# Altium PCB ESP32_C3_TempHumidity_Monitor.PcbDoc
Units mm, origin at the board's own origin, x right, y up, seen from the top; angles counter-clockwise.
Board outline 65.79 x 56.14 mm, 2 copper layers (Top Layer, Bottom Layer); 69 components, 38 nets, 240 pads, 341 vias.
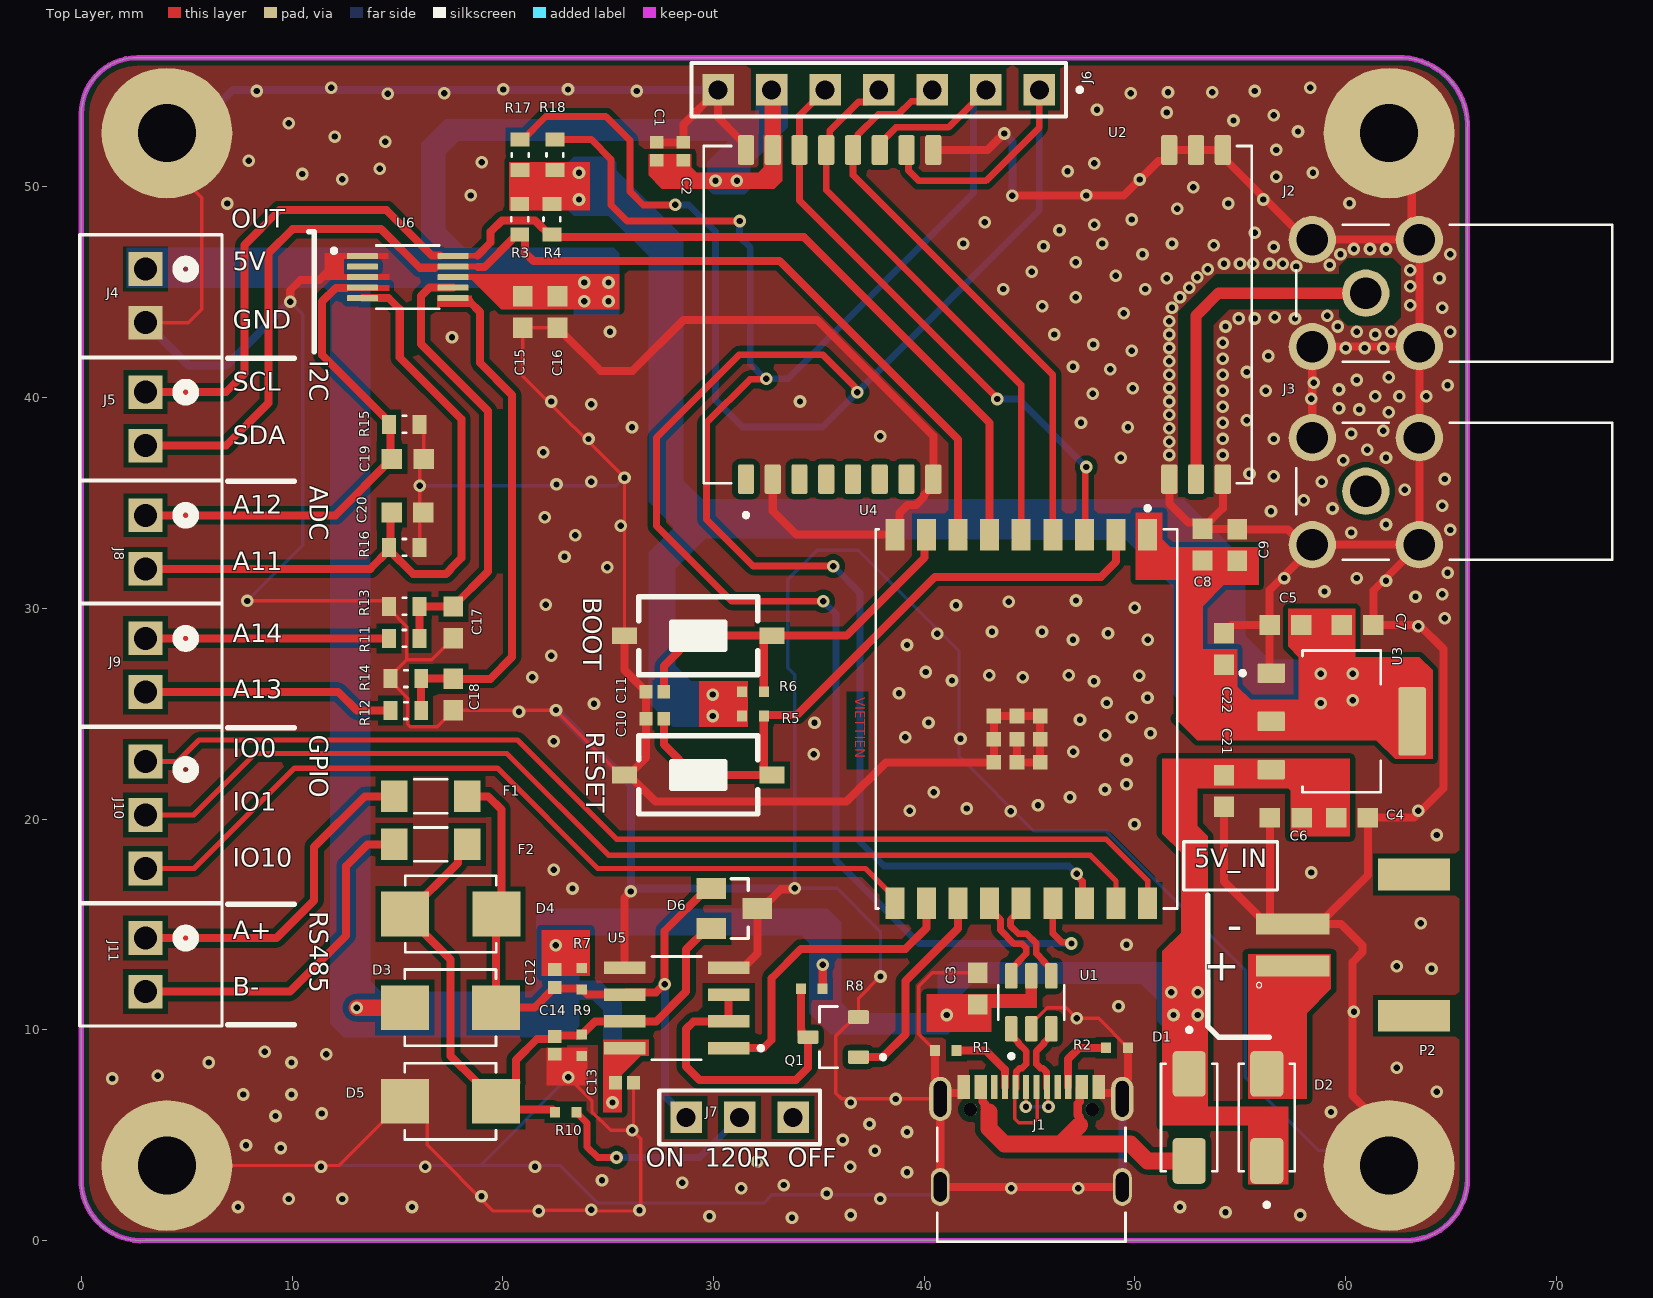
[diagram p0: Top Layer view]
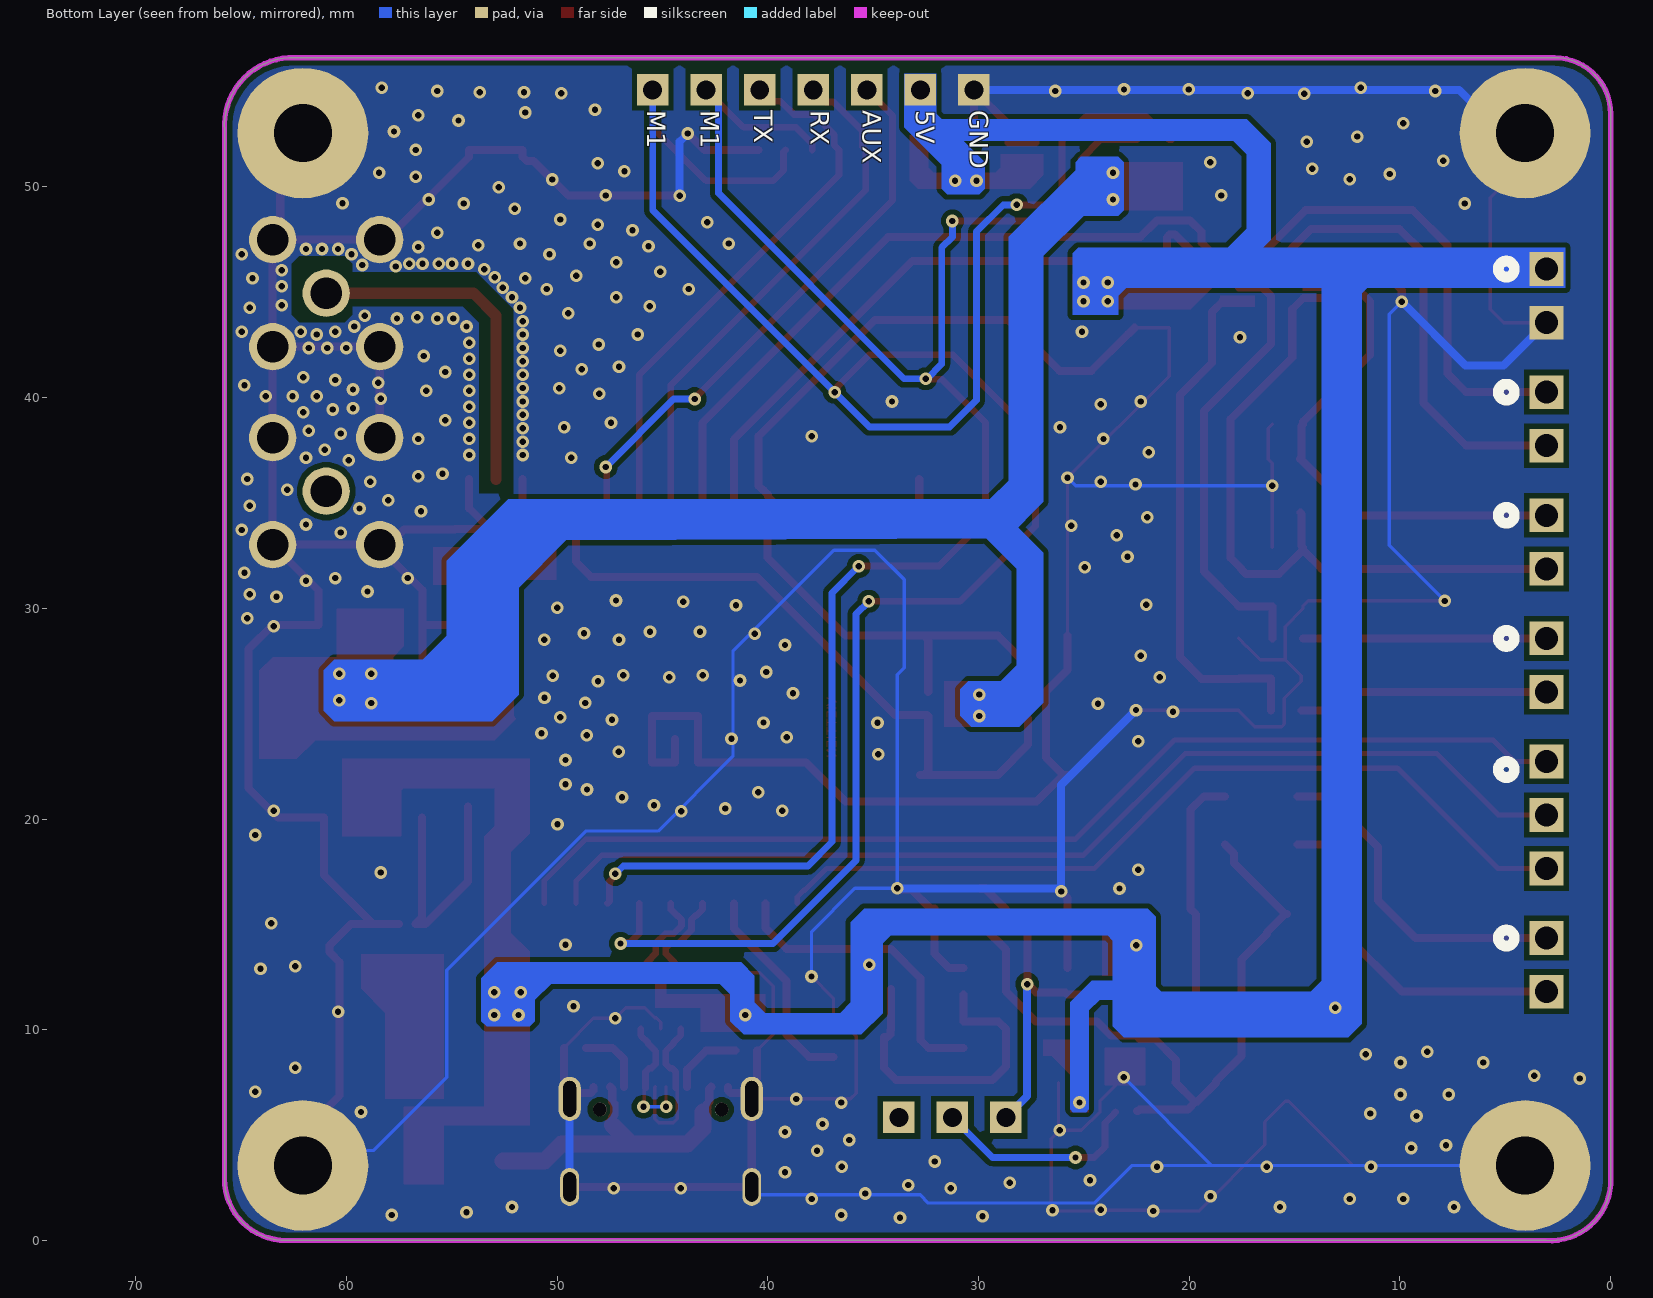
[diagram p1: Bottom Layer view, seen from below]
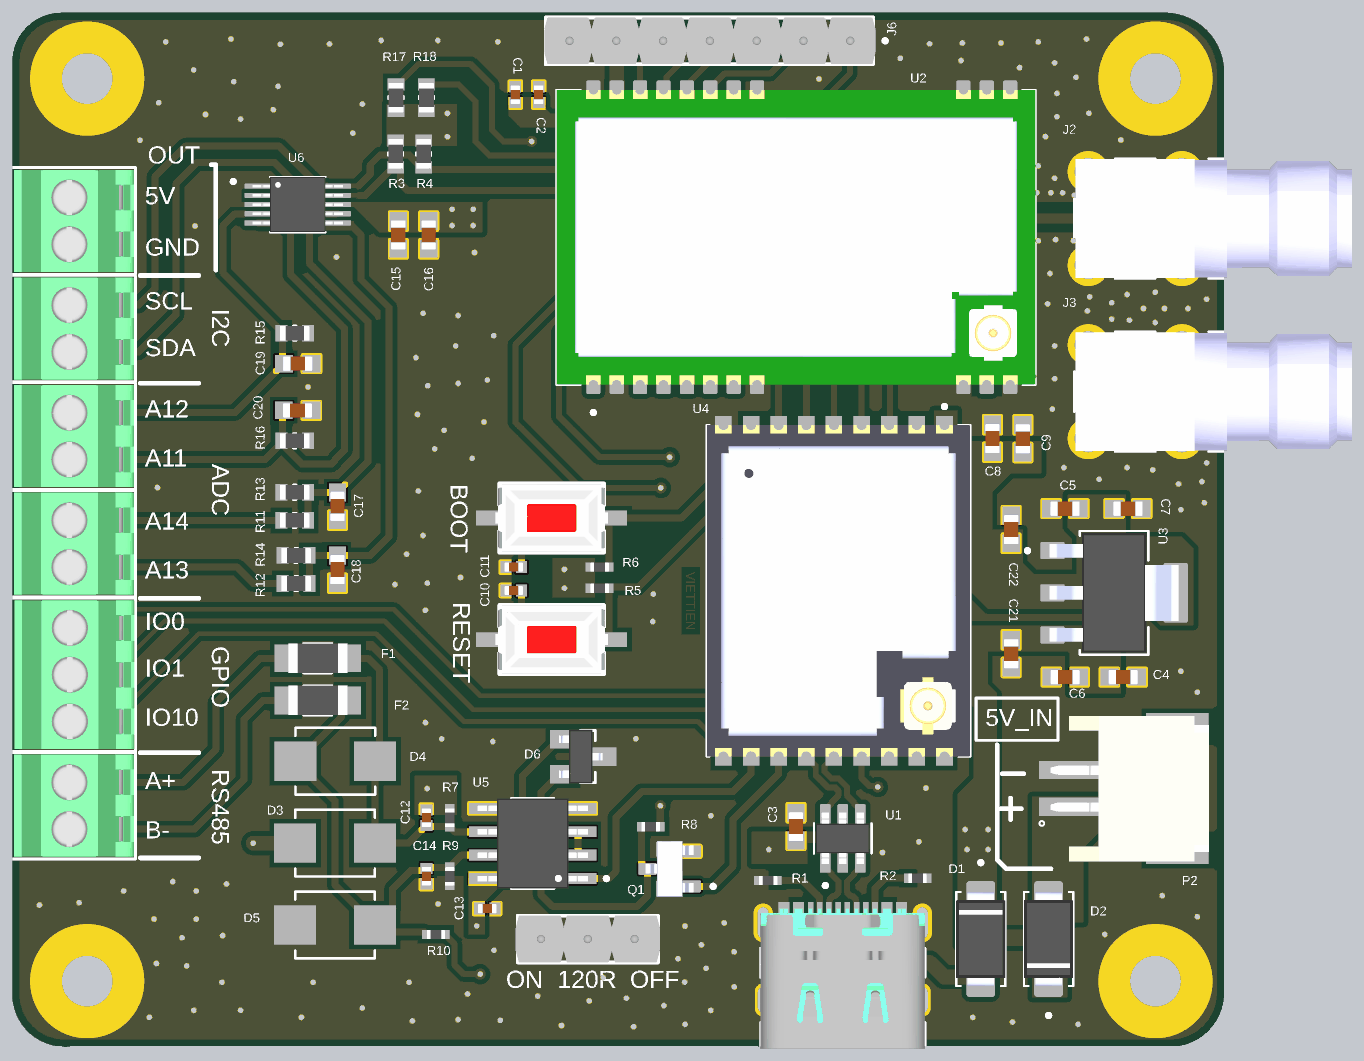
[diagram p2: 3D render of the assembled board from above, using the file's embedded part models]

## Layer stack, top to bottom
Top Solder: solder mask 0.0102, Solder Resist, Dk 3.5
Top Layer: signal copper 0.0356
Dielectric 1: dielectric 0.32, FR-4, Dk 4.8
Bottom Layer: signal copper 0.0356
Bottom Solder: solder mask 0.0102, Solder Resist, Dk 3.5

## Board outline
0,2.667 0,53.467 cw(c2.667,53.467) 2.667,56.134 62.738,56.134 cw(c62.547,52.895) 65.786,52.705 65.786,2.921 cw(c62.865,2.921) 62.865,0 3.048,0 cw(c2.857,2.857)

## Design rules (kind name [scope] priority, off if disabled: settings)
Clearance [All] p1: gap=0.154 ignorepadtopadclearanceinfootprint=FALSE
DiffPairsRouting USB [InDifferentialPair('USB')] p1: maxlimit=0.154 minlimit=0.154 mostfreqgap=0.154 toplayer_minwidth=0.16 toplayer_maxwidth=0.324 toplayer_prefwidth=0.324 bottomlayer_minwidth=0.16 bottomlayer_maxwidth=0.324 bottomlayer_prefwidth=0.324 impedanceprofiledriven=TRUE impedanceprofileid={09F125F2-3EB1-4C5E-979C-77B74D99091C} impedanceprofilevalue=90.000000 maxuncoupledlength=12.7
DiffPairsRouting D [InDifferentialPair('D')] p2: maxlimit=0.154 minlimit=0.154 mostfreqgap=0.154 toplayer_minwidth=0.16 toplayer_maxwidth=0.324 toplayer_prefwidth=0.324 bottomlayer_minwidth=0.16 bottomlayer_maxwidth=0.324 bottomlayer_prefwidth=0.324 impedanceprofiledriven=TRUE impedanceprofileid={09F125F2-3EB1-4C5E-979C-77B74D99091C} impedanceprofilevalue=90.000000 maxuncoupledlength=12.7
HoleSize [All] p1: absolutevalues=TRUE maxlimit=10 minlimit=0.025 maxpercent=80.000 minpercent=20.000
MinimumSolderMaskSliver [All] p1: minsoldermaskwidth=0.01
PolygonConnect [All] p1: connectstyle=Direct reliefconductorwidth=0.254 reliefentries=4 polygonreliefangle="90 Angle" airgapwidth=0.254
RoutingVias [All] p1: holewidth=0.3 width=0.6 viastyle="Through Hole" minholewidth=0.3 minwidth=0.6 maxholewidth=0.3 maxwidth=0.6
SilkToSilkClearance [All] p1: silktosilkclearance=0.01
SilkToSolderMaskClearance [IsPad] p1: minsilkscreentomaskgap=0.1 clearancetoexposedcopper=TRUE
SolderMaskExpansion [All] p1: expansion=0 istentingtop=FALSE
SupplyNets "Schematic Supply Nets_2" [InNet('3V3')] p1: voltage=0.000
SupplyNets "Schematic Supply Nets_1" [InNet('GND')] p2: voltage=0.000
SupplyNets "Schematic Supply Nets" [InNet('5V')] p3: voltage=0.000
Width VBUS [InNet('VBUS')] p1: maxlimit=0.8 minlimit=0.4 preferedwidth=0.6
Width 3V3 [InNet('3V3')] p2: maxlimit=0.8 minlimit=0.4 preferedwidth=0.6
Width 5V [InNet('5V')] p3: maxlimit=0.8 minlimit=0.4 preferedwidth=0.6
Width ANT [InNet('ANT')] p4: maxlimit=0.535 minlimit=0.535 preferedwidth=0.535 impedanceprofiledriven=TRUE impedanceprofileid={34E4B959-E4B6-445B-9DC2-CB0A9B9FC34B} impedanceprofilevalue=50.000000 minimp=50.000000 maximp=50.000000 favimp=50.000000
25 further rules are at their usual default settings.

## Classes and differential pairs
differential pair USB: +USB_P -USB_N
differential pair D: +D_P -D_N

## Components (designator, comment, footprint, x,y, rotation, side; value= is the part's Value field where it differs from the comment)
BOOT "Nut Nhan 2 Chan SMD 3x6x2.5" PCBComponent_1 33.345,30.48 r180 top
C1 "0.1uF" CAPC1005X61N 27.305,51.689 r270 top
C2 "4.7uF" CAPC1005X61N 28.575,51.689 r270 top
C3 "0.1uF" CAPC1608X94N 42.545,11.95 r270 top
C4 "10uF" CAPC1608X94N 60.313,20.066 r180 top
C5 "10uF" CAPC1608X94N 57.15,29.21 r0 top
C6 "0.1uF" CAPC1608X94N 57.162,20.066 r0 top
C7 "0.1uF" CAPC1608X94N 60.567,29.21 r180 top
C8 "0.1uF" CAPC1608X94N 53.213,33.02 r270 top
C9 "10uF" CAPC1608X94N 54.864,33.008 r270 top
C10 "0.1uF" CAPC1005X61N 27.223,24.765 r0 top
C11 "0.1uF" CAPC1005X61N 27.223,26.035 r0 top
C12 "100pF" CAPC1005X61N 22.479,12.431 r90 top
C13 "0.1uF" CAPC1005X61N 25.781,7.493 r180 top
C14 "100pF" CAPC1005X61N 22.479,9.256 r90 top
C15 "10uF" CAPC1608X94N 20.955,44.069 r90 top
C16 "0.1uF" CAPC1608X94N 22.606,44.069 r90 top
C17 "10uF" CAPC1608X94N 17.653,29.337 r90 top
C18 "10uF" CAPC1608X94N 17.653,25.908 r90 top
C19 "10uF" CAPC1608X94N 15.494,37.084 r180 top
C20 "10uF" CAPC1608X94N 15.482,34.544 r180 top
C21 "10uF" CAPC1608X94N 54.229,21.336 r90 top
C22 "10uF" CAPC1608X94N 54.229,28.079 r270 top
D1 "B340A-E3/61T" DIOM5126X229N 52.578,5.842 r270 top
D2 "B340A-E3/61T" DIOM5126X229N 56.261,5.842 r90 top
D3 "SMBJ12CA" DIOM4336X265N 17.52,11.049 r180 top
D4 "SMBJ12CA" DIOM4336X265N 17.532,15.494 r0 top
D5 "SMBJ12CA" DIOM4336X265N 17.52,6.604 r0 top
D6 "SM712-02HTG" SOT23 30.988,15.748 r270 top
F1 "Fuse Thermal" RES_ERJU08J224V 16.584,21.082 r0 top
F2 "Fuse Thermal" RES_ERJU08J224V 16.584,18.796 r0 top
J1 "TypeC_12pin_12402012E212A" TypeC_12pin_12402012E212A 45.085,2.54 r0 top
J2 "85_SMA-50-0-144/111_YH" HUBER+SUHNER_85_SMA-50-0-144/111_YH 60.96,44.958 r90 top
J3 "85_SMA-50-0-144/111_YH" HUBER+SUHNER_85_SMA-50-0-144/111_YH 60.96,35.56 r90 top
J4 "397730002" CONN_39773-0002_MOL 3.048,46.101 r270 top locked
J5 "397730002" CONN_39773-0002_MOL 3.048,40.259 r270 top locked
J6 "TS-107-G-AA" SAMTEC_TS-107-G-AA 37.846,54.61 r180 top
J7 "TS-103-G-AA" SAMTEC_TS-103-G-AA 31.242,5.842 r0 top
J8 "397730002" CONN_39773-0002_MOL 3.048,34.417 r270 top locked
J9 "397730002" CONN_39773-0002_MOL 3.048,28.575 r270 top locked
J10 "397730003" CONN_39773-0003_MOL 3.048,22.733 r270 top locked
J11 "397730002" CONN_39773-0002_MOL 3.048,14.351 r270 top locked
P2 "S2B-PH-SM4-TB" JST_S2B-PH-SM4-TB 57.496,14.018 r270 top
Q1 "MMBT3904" TRANS_MMBT3904 35.687,9.652 r180 top
R1 "5K1" RES_ERJU02F5102X 41.021,9.017 r0 top
R2 "5K1" RES_ERJU02F5102X 49.153,9.144 r180 top
R3 "10K" RES_ERJU03J474V 20.809,48.467 r90 top
R4 "10K" RES_ERJU03J474V 22.333,48.467 r90 top
R5 "10K" RES_ERJU02F5102X 31.877,24.892 r0 top
R6 "10K" RES_ERJU02F5102X 31.877,26.035 r0 top
R7 "10K" RES_ERJU02F5102X 23.749,12.431 r270 top
R8 "10K" RES_ERJU02F5102X 34.671,11.938 r180 top
R9 "10K" RES_ERJU02F5102X 23.749,9.256 r270 top
R10 "120R" RES_ERJU02F5102X 22.987,6.096 r0 top
R11 "10K" RES_ERJU03J474V 15.33,28.575 r0 top
R12 "10K" RES_ERJU03J474V 15.404,25.146 r0 top
R13 "10K" RES_ERJU03J474V 15.33,30.099 r180 top
R14 "10K" RES_ERJU03J474V 15.404,26.67 r180 top
R15 "150R" RES_ERJU03J474V 15.33,38.735 r0 top
R16 "150R" RES_ERJU03J474V 15.33,32.893 r0 top
R17 "10K" RES_ERJU03J474V 20.828,51.525 r90 top
R18 "10K" RES_ERJU03J474V 22.479,51.525 r90 top
RESET "Nut Nhan 2 Chan SMD 3x6x2.5" PCBComponent_1 33.345,23.876 r180 top
U1 "USBLC6-2SC6" USBLC6-2SC6 45.085,11.303 r90 top
U2 "E32-433T20S" MODULE_E32-433T20S 42.545,43.942 r90 top
U3 "AMS1117" SOT229P700X180-4N 59.817,24.638 r0 top
U4 "ESP32-C3-WROOM-02U-N4" XCVR_ESP32-C3-WROOM-02U-N4 44.857,24.752 r270 top
U5 "SP3485EN-L" SOIC127P599X175-8N 28.251,11.03 r180 top
U6 "ADS1015IDGSR" SOP50P490X110-10N 15.494,45.72 r0 top

## Footprints (in the part's own frame and the unit in brackets; to place one, negate y for a bottom-side part, rotate by r counter-clockwise, add the part's x,y. Pads: shape width x height; smd on the part's side, far side on the other; paste and mask are expansions set on the pad)
CAPC1005X61N [mm]
  rect 0.6x0.64 smd paste+0 mask+0.102: 1(-0.426,0) 2(0.426,0)
  body extent -0.51,-0.26 0.51,0.26, height 0.61
CAPC1608X94N [mm]
  rect 0.97x0.94 smd paste+0 mask+0.102: 1(-0.75,0) 2(0.75,0)
  body extent -0.8,-0.4 0.8,0.4, height 0.94
CONN_39773-0002_MOL [mil]
  rect 63x63 hole 43: 1(0,0) 2(100,0)
  silkscreen extent -64,-123 164,143, body extent -59,-116 159,140, height 394
CONN_39773-0003_MOL [mil]
  rect 63x63 hole 43: 1(0,0) 2(100,0) 3(200,0)
  silkscreen extent -64,-123 264,143, body extent -59,-115 259,141, height 394
DIOM4336X265N [mm]
  rect 2.28x2.12 smd: 1(-2.165,0) 2(2.165,0)
  silkscreen extent -2.16,-1.81 2.16,1.81
DIOM5126X229N [mm]
  rrect25% 2.17x1.57 smd: A(2.065,0) C(-2.065,0)
  silkscreen extent -4.25,-1.33 2.55,1.33, body extent -2.55,-1.33 2.55,1.33, height 2.29
HUBER+SUHNER_85_SMA-50-0-144/111_YH [mm]
  round 2.25 hole 1.5: 1(0,0) G1(-2.54,2.54) G2(2.54,2.54) G3(-2.54,-2.54) G4(2.54,-2.54)
  silkscreen extent -3.25,-11.7 3.25,3.3, body extent -3.22,-11.77 3.23,3.23, height 9.9
JST_S2B-PH-SM4-TB [mm]
  rect 1x3.5 smd: 1(1,0) 2(-1,0)
  rect 1.5x3.4 smd: P1(3.35,5.75) P2(-3.35,5.75)
  silkscreen extent 1.77,-1.73 2.03,-1.47, body extent -3.94,-1.12 3.96,7.48, height 5.63
MODULE_E32-433T20S [mm]
  rrect25% 1.41x0.77 smd: 1(-7.81,11) 2(-7.81,9.73) 3(-7.81,8.46) 4(-7.81,7.19) 5(-7.81,5.92) 6(-7.81,4.65) 7(-7.81,3.38) 8(-7.81,2.11) 11(-7.81,-9.09) 12(-7.81,-10.36) 13(-7.81,-11.63) 14(7.81,-11.63) 15(7.81,-10.36) 16(7.81,-9.09) 19(7.81,2.11) 20(7.81,3.38) 21(7.81,4.65) 22(7.81,5.92) 23(7.81,7.19) 24(7.81,8.46) 25(7.81,9.73) 26(7.81,11)
  silkscreen extent -9.61,-13 8,13, body extent -8,-13 8,13, height 3.25
PCBComponent_1 [mm]
  rect 1.2x0.8 smd: 1(0.564,1.778) 2(7.564,1.778)
  silkscreen extent 1.24,-0.08 6.88,3.63, body extent 1.01,-0.07 7.11,3.63, height 2.5
RES_ERJU02F5102X [mm]
  rect 0.475x0.5 smd: 1(-0.512,0) 2(0.512,0)
  body extent -0.49,-0.25 0.51,0.25, height 0.35
RES_ERJU03J474V [mm]
  rect 0.65x0.9 smd: 1(-0.725,0) 2(0.725,0)
  silkscreen extent -0.08,-0.4 0.08,0.4, body extent -0.8,-0.4 0.8,0.4, height 0.45
RES_ERJU08J224V [mm]
  rect 1.25x1.5 smd: 1(-1.725,0) 2(1.725,0)
  silkscreen extent -0.78,-0.8 0.78,0.8, body extent -1.6,-0.8 1.6,0.8, height 0.6
SAMTEC_TS-103-G-AA [mm]
  rect 1.5x1.5 hole 0.9: 01(-2.54,0) 02(0,0) 03(2.54,0)
  silkscreen extent -3.81,-1.27 3.81,1.27, body extent -3.91,-1.27 3.91,1.27, height 8.28
SAMTEC_TS-107-G-AA [mm]
  rect 1.5x1.5 hole 0.9: 01(-7.62,0) 02(-5.08,0) 03(-2.54,0) 04(0,0) 05(2.54,0) 06(5.08,0) 07(7.62,0)
  silkscreen extent -9.64,-1.27 8.89,1.27, body extent -9.02,-1.27 8.97,1.27, height 8.28
SOIC127P599X175-8N [mm]
  rect 1.97x0.59 smd paste+0 mask+0.102: 1(-2.47,1.905) 2(-2.47,0.635) 3(-2.47,-0.635) 4(-2.47,-1.905) 5(2.47,-1.905) 6(2.47,-0.635) 7(2.47,0.635) 8(2.47,1.905)
  silkscreen extent -4.1,-2.45 1.16,2.45, body extent -3,-2.45 3,2.45, height 1.75
SOP50P490X110-10N [mm]
  rrect25% 1.47x0.28 smd: 1(-2.15,1) 2(-2.15,0.5) 3(-2.15,0) 4(-2.15,-0.5) 5(-2.15,-1) 6(2.15,-1) 7(2.15,-0.5) 8(2.15,0) 9(2.15,0.5) 10(2.15,1)
  silkscreen extent -3.6,-1.5 1.5,1.5, body extent -2.45,-1.5 2.45,1.5, height 1.1
SOT23 [mm]
  rect 1x1.4 smd: 1(-0.95,-1.1) 2(0.95,-1.1) 3(0,1.1)
  silkscreen extent -1.42,-0.15 1.42,0.66, body extent -1.46,-1.31 1.46,1.06, height 1.12
SOT229P700X180-4N [mm]
  rrect15% 1.31x0.93 smd: 1(-3.345,2.29) 2(-3.345,0) 3(-3.345,-2.29)
  rrect15% 1.31x3.24 smd: 2(3.345,0)
  silkscreen extent -4.8,-3.36 1.86,3.36, body extent -3.5,-3.25 3.5,3.25, height 1.8
TRANS_MMBT3904 [mm]
  rrect25% 1x0.65 smd paste+0 mask+0.102: 1(-1.2,0.95) 2(-1.2,-0.95) 3(1.2,0)
  silkscreen extent -2.46,-1.45 0.65,1.45, body extent -1.3,-1.52 1.3,1.52, height 1.3
TypeC_12pin_12402012E212A [mm]
  rect 0.6x1.14 smd: A1_B12(-3.2,4.75) A4_B9(-2.4,4.75) B1_A12(3.2,4.75) B4_A9(2.4,4.75)
  rect 0.3x1.14 smd: A5(-1.25,4.75) A6(-0.25,4.75) A7(0.25,4.75) A8(1.25,4.75) B5(1.75,4.75) B6(0.75,4.75) B7(-0.75,4.75) B8(-1.75,4.75)
  oval 1.05x2.1 hole 0.6 slot 1.7 at 90 deg: SH1(-4.32,4.18) SH2(4.32,4.18)
  oval 0.9x1.8 hole 0.6 slot 1.4 at 90 deg: SH3(-4.32,0) SH4(4.32,0)
  round 0.65 hole 0.65 unplated: ""(-2.89,3.68) ""(2.89,3.68)
  silkscreen extent -4.47,-2.6 4.47,2.81, body extent -4.47,-2.65 4.47,4.95, height 3.15
USBLC6-2SC6 [mm]
  rrect25% 1.21x0.59 smd: 1(-1.255,0.95) 2(-1.255,0) 3(-1.255,-0.95) 4(1.255,-0.95) 5(1.255,0) 6(1.255,0.95)
  silkscreen extent -2.65,-1.57 0.81,1.57, body extent -1.4,-1.46 1.4,1.46, height 1.44
XCVR_ESP32-C3-WROOM-02U-N4 [mm]
  rect 1.5x0.9 smd: 1(-8.75,5.75) 2(-8.75,4.25) 3(-8.75,2.75) 4(-8.75,1.25) 5(-8.75,-0.25) 6(-8.75,-1.75) 7(-8.75,-3.25) 8(-8.75,-4.75) 9(-8.75,-6.25) 10(8.75,-6.25) 11(8.75,-4.75) 12(8.75,-3.25) 13(8.75,-1.75) 14(8.75,-0.25) 15(8.75,1.25) 16(8.75,2.75) 17(8.75,4.25) 18(8.75,5.75)
  rect 0.7x0.7 smd: 19_1(-0.14,0.65) 19_2(0.96,0.65) 19_3(2.06,0.65) 19_4(-0.14,-0.45) 19_5(0.96,-0.45) 19_6(2.06,-0.45) 19_7(-0.14,-1.55) 19_8(0.96,-1.55) 19_9(2.06,-1.55)
  silkscreen extent -10.1,-7.15 9,7.15, body extent -9,-7.15 9,7.15, height 3.35

## Part data
C1 C2 C10 C11 C12 C13 C14: library part cap_0402_VJ0402D100MXCAP, "cap 0402", Package="1005 Vishay Vitramon", Check_prices=https://www.snapeda.com/parts/VJ0402D100MXCAP/Vishay/view-part/?ref=eda, MF="Vishay Vitramon", MP=VJ0402D100MXCAP, SnapEDA_Link=https://www.snapeda.com/parts/VJ0402D100MXCAP/Vishay/view-part/?ref=snap
C3 C4 C5 C6 C7 C8 C9 C15 C16 C17 C18 C19 C20 C21 C22: library part cap_0603_VJ0603D3R9DXCAP, "cap 0603 (1608 Metric)", Package="1608 Vishay Vitramon", Check_prices=https://www.snapeda.com/parts/VJ0603D3R9DXCAP/Vishay/view-part/?ref=eda, MF="Vishay Vitramon", MP=VJ0603D3R9DXCAP, SnapEDA_Link=https://www.snapeda.com/parts/VJ0603D3R9DXCAP/Vishay/view-part/?ref=snap
D1 D2: "Diode Schottky 40 V 3A Surface Mount DO-214AC (SMA)", Package="DO-214 Vishay Semiconductor", Check_prices=https://www.snapeda.com/parts/B340A-E3/61T/Vishay/view-part/?ref=eda, MF="Vishay Semiconductor", MP=B340A-E3/61T, SnapEDA_Link=https://www.snapeda.com/parts/B340A-E3/61T/Vishay/view-part/?ref=snap
D3 D4 D5: library part SMBJ10CA-13-F, Package=None, Availability=Unavailable, MF="{'manufacturer': u'Diodes Incorporated'}", MP=SMBJ10CA-13-F, Price=None
D6: "TVS Diode, SM712 Series, 31V Clamp, 600W Peak Pulse, Surface Mount, SOT23-3", Package="SOT-23 Littelfuse Inc.", Check_prices=https://www.snapeda.com/parts/SM712-02HTG/Littelfuse/view-part/?ref=eda, MF="Littelfuse Inc.", MP=SM712-02HTG, SnapEDA_Link=https://www.snapeda.com/parts/SM712-02HTG/Littelfuse/view-part/?ref=snap
F1 F2: "Fuse, Resettable, Fast Acting, 10A, Sz 1206, 0.134x0.071x0.033\", SMT, 24VDC, PCB"
J1: "USB2.0, Type C, Top mount, CH 1.68mm, Dual Row SMT", Package=None, Availability="In Stock", Check_prices=https://www.snapeda.com/parts/12402012E212A/Amphenol/view-part/?ref=eda, MF="Amphenol ICC (Commercial Products)", MP=12402012E212A, Price=None, Purchase-URL=https://pricing.snapeda.com/search/part/12402012E212A/?ref=eda, SnapEDA_Link=https://www.snapeda.com/parts/12402012E212A/Amphenol/view-part/?ref=snap
J2 J3: "RF Connector, SMA Right angle PCB jack(f)", Package=None, Check_prices=https://www.snapeda.com/parts/85_SMA-50-0-144/111_YH/Huber%252BSuhner/view-part/?ref=eda, MF=HUBER+SUHNER, MP=85_SMA-50-0-144/111_YH, SnapEDA_Link=https://www.snapeda.com/parts/85_SMA-50-0-144/111_YH/Huber%252BSuhner/view-part/?ref=snap
J4 J5 J8 J9 J11: "2 Position Wire to Board Terminal Block Horizontal with Board 0.100 (2.54mm) Through Hole", Package=None, Check_prices=https://www.snapeda.com/parts/397730002/Molex/view-part/?ref=eda, MF=Molex, MP=397730002, SnapEDA_Link=https://www.snapeda.com/parts/397730002/Molex/view-part/?ref=snap
J6: "Conn Unshrouded Header HDR 7 POS 2.54mm Solder ST Top Entry Thru-Hole Tube", Package=None, Availability="In Stock", Check_prices=https://www.snapeda.com/parts/TS-107-G-AA/Samtec/view-part/4675875/?ref=eda, MF="Samtec Inc.", MP=TS-107-G-AA, Price=None, Purchase-URL=https://pricing.snapeda.com/search/part/TS-107-G-AA/?ref=eda, SnapEDA_Link=https://www.snapeda.com/parts/TS-107-G-AA/Samtec/view-part/4675875/?ref=snap
J7: "Conn Unshrouded Header HDR 3 POS 2.54mm Solder ST Thru-Hole Bulk", Package=None, Availability="In Stock", Check_prices=https://www.snapeda.com/parts/TS-103-G-AA/Samtec/view-part/?ref=eda, MF=Samtec, MP=TS-103-G-AA, Price=None, Purchase-URL=https://pricing.snapeda.com/search/part/TS-103-G-AA/?ref=eda, SnapEDA_Link=https://www.snapeda.com/parts/TS-103-G-AA/Samtec/view-part/?ref=snap
J10: "3 Position Wire to Board Terminal Block Horizontal with Board 0.100 (2.54mm) Through Hole", Package=None, Check_prices=https://www.snapeda.com/parts/0397730003/Molex/view-part/?ref=eda, MF=Molex, MP=0397730003, SnapEDA_Link=https://www.snapeda.com/parts/0397730003/Molex/view-part/?ref=snap
P2: "Connector Header Surface Mount, Right Angle 2 position 0.079 (2.00mm)", Package=None, Check_prices=https://www.snapeda.com/parts/S2B-PH-SM4-TB/JST/view-part/?ref=eda, MF="JST Sales", MP=S2B-PH-SM4-TB, SnapEDA_Link=https://www.snapeda.com/parts/S2B-PH-SM4-TB/JST/view-part/?ref=snap
Q1: "BJT, SOT-23, 40V, 200mA, NPN, 0.35W, 150Â°C", Package="SOT-23 Diotec", Check_prices=https://www.snapeda.com/parts/MMBT3904/Diotec/view-part/?ref=eda, MF="Diotec Semiconductor", MP=MMBT3904, SnapEDA_Link=https://www.snapeda.com/parts/MMBT3904/Diotec/view-part/?ref=snap
R1 R2 R5 R6 R7 R8 R9 R10: library part res_0402_ERJU02F5102X, Package=None, Availability=Unavailable, MP=ERJU02F5102X, Price=None
R3 R4 R11 R12 R13 R14 R15 R16 R17 R18: library part res_0603_ERJU03J474V, "0603 Anti-Sulfurated", Package="1608-2 Panasonic", Check_prices=https://www.snapeda.com/parts/ERJU03J474V/Panasonic/view-part/?ref=eda, MF=Panasonic, MP=ERJU03J474V, SnapEDA_Link=https://www.snapeda.com/parts/ERJU03J474V/Panasonic/view-part/?ref=snap
U1: "17V Clamp 5A (8/20Âµs) Ipp Tvs Diode Surface Mount SOT-23-6", Package="SOT-23-6 STMicroelectronics", Availability="In Stock", Check_prices=https://www.snapeda.com/parts/USBLC6-2SC6/STMicroelectronics/view-part/?ref=eda, MF=STMicroelectronics, MP=USBLC6-2SC6, Price=None, Purchase-URL=https://pricing.snapeda.com/search/part/USBLC6-2SC6/?ref=eda, SnapEDA_Link=https://www.snapeda.com/parts/USBLC6-2SC6/STMicroelectronics/view-part/?ref=snap
U2: "Wireless serial port module (UART)", Package=Package, Availability="Not in stock", Check_prices=https://www.snapeda.com/parts/E32-433T20S/EBYTE/view-part/?ref=eda, MF=EBYTE, MP=E32-433T20S, Price=None, SnapEDA_Link=https://www.snapeda.com/parts/E32-433T20S/EBYTE/view-part/?ref=snap
U3: "1A LOW DROPOUT VOLTAGE REGULATOR SOT-223", Package="SOT-223 Seeed Technology", Check_prices=https://www.snapeda.com/parts/AMS1117/Advanced+Monolithic+Systems/view-part/?ref=eda, MF="Advanced Monolithic Systems", MP=AMS1117, SnapEDA_Link=https://www.snapeda.com/parts/AMS1117/Advanced+Monolithic+Systems/view-part/?ref=snap
U4: "Bluetooth, WiFi 802.11b/g/n, Bluetooth v5.0 Transceiver Module 2.4GHz Antenna Not Included, U.FL Surface Mount", Package="SMD-19 Espressif Systems", Check_prices=https://www.snapeda.com/parts/ESP32-C3-WROOM-02U-N4/Espressif+Systems/view-part/?ref=eda, MF="Espressif Systems", MP=ESP32-C3-WROOM-02U-N4, SnapEDA_Link=https://www.snapeda.com/parts/ESP32-C3-WROOM-02U-N4/Espressif+Systems/view-part/?ref=snap
U5: "1/1 Transceiver Half RS422, RS485 8-SOIC", Package=None, Check_prices=https://www.snapeda.com/parts/SP3485EN-L/MaxLinear/view-part/?ref=eda, MF="MaxLinear, Inc.", MP=SP3485EN-L, SnapEDA_Link=https://www.snapeda.com/parts/SP3485EN-L/MaxLinear/view-part/?ref=snap
U6: "12-bit, 3.3-kSPS, 4-channel, delta-sigma ADC with PGA, oscillator, VREF, comparator and I2C", Package="VSSOP-10 Texas Instruments", Check_prices=https://www.snapeda.com/parts/ADS1015IDGSR/Texas+Instruments/view-part/?ref=eda, MF="Texas Instruments", MP=ADS1015IDGSR, SnapEDA_Link=https://www.snapeda.com/parts/ADS1015IDGSR/Texas+Instruments/view-part/?ref=snap
BOOT RESET: Ma_Hang=MH001036, Ten="Nút Nhấn 2 Chân 3x6x2.5MM SMD"

## Free pads (board coordinates)
  round 6.2 hole 2.75: 17(4.064,3.556) 17(4.064,52.556) 17(62.064,3.556) 17(62.064,52.556)

## Via types
v1: diameter 0.6, hole 0.3, Top Layer to Bottom Layer, tented both sides, 341 vias

## Nets (pads, with @x,y where several pads share a name; then routed paths per layer and width w, separated by ;. In a path a pad name is that pad's centre, name@x,y a point inside that pad or via, vN(x,y) a via of type N, cw(c..) or ccw(c..) an arc to the next point about the centre after c; other vN are vias at no path point)
3V3: C5.2 C7.2 C8.2 C9.2 C22.2 R3.2 R4.2 R5.1 R6.1 R17.1 R18.1 U3.2 U4.1
  other v1: 29.972,24.892 58.823,25.505 60.347,25.632 29.972,25.908 58.823,26.902 60.347,26.902 23.622,49.403 23.622,50.673
5V: C1.2 C2.2 C3.2 C4.2 C6.2 C12.2 C13.2 C15.2 C16.2 C21.2 D1.C D2.C D3.2 J4.1 J6.06 R7.1 R8.1 U1.5 U2.25 U3.3 U5.8 U6.8 | length 6.2
  Top Layer w0.4: R8.1@35.181,11.94 v1(35.181,13.079)
  Top Layer w0.8: v1(13.074,11.047) 15.353,11.047 D3.2 ; U2.25 J6.06@32.815,54.561
  other v1: 25.212,6.549 41.07,10.7 51.836,10.7 52.979,10.7 51.73,11.785 52.979,11.785 22.521,14.008 23.876,44.577 25.019,44.577 23.876,45.466 25.019,45.466 30.099,50.292 31.115,50.292
A: F1.1 J11.1 | length 16.1
  Top Layer w0.381: J11.1 9.271,14.351 11.049,16.129 11.049,18.669 13.462,21.082 F1.1
A11: C20.2 J8.2 R16.1 U6.5 | length 33
  Top Layer w0.381: J8.2 13.714,31.877 R16.1@14.605,32.768 ; U6.5 14.589,44.72 15.113,44.196 15.113,41.91 18.034,38.989 18.034,32.385 17.526,31.877 17.526,31.846 17.303,31.623 15.75,31.623 R16.1@14.605,32.768 ; C20.2 14.668,34.48 14.668,32.956 R16.1 R16.1@14.605,32.768
A12: C19.2 J8.1 R15.1 U6.4 | length 23.1
  Top Layer w0.381: J8.1 12.062,34.417 14.729,37.084 C19.2 14.674,37.153 14.674,38.666 R15.1 14.605,38.86 11.43,42.035 11.43,44.556 12.086,45.212 12.573,45.212
A13: J9.2 R12.1 | length 12
  Top Layer w0.381: J9.2 12.192,26.035 13.081,25.146 R12.1
A14: J9.1 R11.1 | length 11.6
  Top Layer w0.381: J9.1 R11.1
A+: C12.1 D3.1 D4.2 D6.1 F1.2 J7.01 R7.2 U5.6 | length 32.4
  Top Layer w0.381: F1.2 19.304,21.082 19.939,20.447 19.939,15.736 D4.2 19.685,15.482 D3.1 21.503,11.049 22.459,12.005 C12.1 22.522,11.962 23.706,11.962 R7.2 ; R7.2@23.761,11.919 24.015,11.665 U5.6 25.886,11.77 27.264,11.77 27.686,12.192 27.686,14.696 29.688,16.698 D6.1
  Bottom Layer w0.381: v1(27.691,12.165) 27.691,6.853 J7.01
AIN2: C18.2 R12.2 R14.1 U6.6 | length 24.6
  Top Layer w0.381: R12.2 R14.1 16.135,26.664 17.647,26.664 C18.2 19.419,26.658 20.447,27.686 20.447,40.132 18.923,41.656 18.923,44.069 18.415,44.577 17.78,44.577
AIN3: C17.2 R11.2 R13.1 U6.7 | length 21.5
  Top Layer w0.381: R11.2 R13.1 16.061,30.093 17.647,30.093 C17.2 17.653,30.102 19.304,31.753 19.304,39.37 16.129,42.545 16.129,44.831 16.518,45.22 U6.7
ANT: J2.1 U2.12 | length 16.3
  Top Layer w0.535: U2.12 52.905,43.888 53.975,44.958 J2.1
AUX: J6.05 U2.24 U4.3 | length 27.9
  Top Layer w0.324: J6.05 34.085,53.389 U2.24 34.085,49.354 43.474,39.965 v1(43.474,39.935) ; U4.3 47.65,33.545 47.65,36.669 v1(47.693,36.712)
  Bottom Layer w0.324: v1(43.474,39.935) 44.469,39.935 v1(47.693,36.712)
B: F2.1 J11.2 | length 16.6
  Top Layer w0.381: J11.2 9.906,11.811 12.573,14.478 12.573,17.78 13.589,18.796 F2.1
B-: C14.2 D4.1 D5.2 D6.2 F2.2 R9.1 R10.1 U5.7 | length 33.7
  Top Layer w0.381: D4.1 D4.1@15.447,15.494 ; F2.2 17.875,18.361 17.875,17.922 D4.1@15.447,15.494 ; D5.2@20.635,7.474 20.635,8.57 21.638,9.573 22.37,9.573 22.522,9.725 23.706,9.725 R9.1 ; D5.2@20.654,7.493 19.765,6.604 D5.2 ; R10.1@22.475,6.155 22.428,6.155 22.36,6.223 20.066,6.223 D5.2 ; R9.1@23.761,9.768 23.808,9.815 23.808,9.828 24.376,10.395 U5.7 27.286,10.395 28.702,11.811 28.702,13.812 29.688,14.798 D6.2 ; D4.1@15.447,15.494 16.317,14.624 16.317,14.544 17.526,13.335 17.526,8.763 18.735,7.554 18.735,7.474 19.605,6.604 D5.2
BOOT: BOOT.1 C11.2 R6.2 U4.8 | length 19.8
  Top Layer w0.381: C11.2 27.649,27.268 29.083,28.702 32.581,28.702 BOOT.1 ; R6.2 32.389,28.492 32.599,28.702 BOOT.1 ; U4.8 40.024,33.419 40.024,32.404 36.322,28.702 BOOT.1
D_N: U1.6 U4.13 | length 4.7
  Top Layer w0.324: U4.13 43.107,15.702 43.395,15.414 43.429,15.414 43.618,15.224 43.618,14.738 44.276,14.08 44.657,14.08 44.846,13.891 44.846,13.623 44.474,13.251 44.474,13.207 44.135,12.868 U1.6
D_P: U1.4 U4.14 | length 4.7
  Top Layer w0.324: U4.14 44.607,15.702 44.319,15.414 44.285,15.414 44.096,15.224 44.096,14.936 44.474,14.558 44.854,14.558 45.324,14.089 45.324,13.623 45.696,13.251 45.696,13.207 46.035,12.868 U1.4
GND: BOOT.2 C1.1 C2.1 C3.1 C4.1 C5.1 C6.1 C7.1 C8.1 C9.1 C10.1 C11.1 C13.1 C14.1 C15.1 C16.1 C17.1 C18.1 C19.1 C20.1 C21.1 C22.1 D5.1 D6.3 J1.A1_B12 J1.B1_A12 J1.SH1 J1.SH2 J1.SH3 J1.SH4 J2.G1 J2.G2 J2.G3 J2.G4 J3.G1 J3.G2 J3.G3 J3.G4 J4.2 J6.07 P2.2 pad.17 Q1.2 R1.1 R2.1 R9.2 R13.2 R14.2 R15.2 R16.2 RESET.2 U1.2 U2.2 U2.8 U2.11 U2.13 U2.14 U2.15 U2.16 U2.19 U2.26 U3.1 U4.9 U4.19_1 U4.19_2 U4.19_3 U4.19_4 U4.19_5 U4.19_6 U4.19_7 U4.19_8 U4.19_9 U5.4 U5.5 U6.1 U6.3 | length 570.2
  Top Layer w0.16: J4.2 5.08,43.561 5.715,44.196 5.715,49.484 4.064,51.135 pad.17@4.064,52.556 ; pad.17@4.064,3.556 12.227,3.556 15.275,6.604 D5.1 15.435,6.604 16.415,5.624 16.415,4.54 19.558,1.397 v1(21.717,1.397) 21.751,1.431 24.168,1.431 24.202,1.397 26.449,1.397 26.543,1.491 26.543,4.826 26.207,5.162 C13.1 ; v1(7.874,30.353) 14.36,30.353 14.605,30.108 14.605,29.974 15.443,29.136 15.443,27.559 ; R16.2 v1(16.055,35.814) 16.055,36.895 C19.1 16.244,38.546 R15.2 ; C17.1 17.653,28.572 17.263,28.182 17.248,28.182 16.625,27.559 15.443,27.559 ; C16.1 C15.1 20.955,41.021 v1(25.781,36.195) BOOT.2 ; v1(23.114,7.747) 24.235,6.626 24.235,6.118 25.119,5.234 v1(26.146,5.234) ; RESET.2 25.581,22.098 22.521,25.158 C18.1 17.653,25.143 16.894,24.384 15.621,24.384 15.494,24.511 15.494,25.73 14.679,26.545 R14.2 14.679,26.795 15.443,27.559 ; v1(37.928,12.531) 36.887,11.489 Q1.2 36.712,10.602 35.814,9.704 35.814,6.985 36.079,6.72 J1.SH1 ; R1.1 40.509,9.029 39.751,9.787 39.751,12.065 40.386,12.7 C3.1 ; U1.2 45.085,10.358 45.3,10.573 45.371,10.573 45.847,11.049 46.736,11.049 v1(47.244,10.541) 48.281,10.541 49.665,9.156 R2.1
  Top Layer w0.381: v1(9.917,44.558) 9.917,45.096 10.414,45.593 11.303,45.593 11.938,46.228 ; C16.1 22.606,43.304 22.886,43.024 22.901,43.024 24.65,41.275 26.162,41.275 28.575,43.688 34.925,43.688 40.435,38.178 40.435,35.812 40.24,35.618 40.218,35.618 39.995,35.394 39.995,35.299 39.608,34.913 39.216,34.913 38.829,34.526 38.829,33.724 U4.9 33.935,33.502 32.815,34.622 U2.2 ; U5.5 25.781,16.264 v1(26.084,16.566) ; RESET.2 RESET.2@25.981,22.098 ; BOOT.2 25.781,27.071 26.797,26.055 C11.1 C10.1 26.797,22.914 RESET.2@25.981,22.098 ; C1.1 C2.1 28.575,52.959 J6.07 30.226,53.288 31.248,52.266 31.35,52.266 31.545,52.072 U2.26 ; U5.4 31.411,12.935 32.088,13.612 D6.3 32.288,15.748 33.209,16.669 33.812,16.669 v1(33.854,16.711) ; U2.19 43.008,51.752 v1(43.795,52.539) ; R1.1 40.509,7.682 40.765,7.426 J1.SH1 ; J1.A1_B12 41.885,7.114 41.775,7.005 41.05,7.005 J1.SH1 ; v1(44.185,49.583) 49.466,49.583 51.12,51.237 51.44,51.237 51.635,51.432 U2.16 U2.15 U2.14 54.175,51.432 58.109,47.498 J2.G2 J2.G4 ; U4.19_5 U4.19_6 U4.19_3 U4.19_2 U4.19_1 U4.19_4 U4.19_7 U4.19_8 U4.19_9 38.186,22.692 36.322,20.828 27.251,20.828 RESET.2@25.981,22.098 ; J1.B1_A12 48.285,7.114 48.395,7.005 49.12,7.005 J1.SH2 49.405,7.426 49.665,7.686 R2.1 ; J1.SH4 J1.SH3 J1.SH1 ; U2.11 51.635,34.979 52.55,34.065 52.933,34.065 53.219,33.779 53.219,33.764 54.858,33.764 54.858,33.749 57.262,33.749 57.991,33.02 J3.G1 ; C8.1@53.219,33.791 54.175,34.747 U2.13 ; C21.1 54.229,17.035 56.246,15.018 56.721,15.018 56.412,15.328 C6.1 ; C22.1 54.229,28.844 54.595,29.21 C5.1 ; U3.1 56.4,27 C5.1 ; P2.2 P2.2@58.746,15.018 ; J3.G2 J2.G1 J2.G3 ; pad.17@62.064,3.556 62.064,5.131 60.325,6.87 60.325,13.208 60.802,13.685 60.802,14.001 59.785,15.018 P2.2@58.746,15.018 ; pad.17@62.064,52.556 63.142,51.478 63.142,47.856 J2.G4 ; C5.1 56.4,30.873 58.42,32.893 J3.G1 ; J3.G1 J3.G3 ; P2.2@58.746,15.018 61.063,17.335 C4.1 63.246,20.066 64.643,21.463 64.643,28.067 63.5,29.21 C7.1 61.317,30.837 J3.G3 ; J3.G3 J3.G4 J2.G3 ; J2.G3 J2.G4
  Bottom Layer w0.16: pad.17@4.064,3.556 18.923,3.556 ; v1(7.874,30.353) 10.507,32.986 10.507,43.968 v1(9.917,44.558) ; v1(16.055,35.814) 25.398,35.814 v1(25.781,36.195) v1(25.781,36.195) ; v1(23.114,7.747) 18.923,3.556 ; v1(37.928,12.531) 37.928,14.65 35.867,16.711 v1(33.854,16.711) 33.854,26.852 33.528,27.178 33.528,31.369 34.925,32.766 36.863,32.766 41.656,27.973 41.656,22.987 45.212,19.431 48.641,19.431 55.245,12.827 55.245,7.747 58.724,4.268 61.352,4.268 pad.17@62.064,3.556 ; J1.SH3 40.765,2.512 40.423,2.17 32.774,2.17 32.382,1.778 24.511,1.778 22.733,3.556 18.923,3.556
  Bottom Layer w0.381: J4.2 5.08,41.529 6.888,41.529 v1(9.917,44.558) ; pad.17@4.064,52.556 5.148,52.556 7.202,54.61 J6.07 ; v1(22.529,25.172) 26.084,21.617 v1(26.084,16.566) 26.228,16.711 v1(33.854,16.711) ; v1(43.795,52.539) 44.185,52.149 v1(44.185,49.583) ; J1.SH4 J1.SH2
  other v1: 33.727,1.084 29.811,1.15 36.521,1.211 57.857,1.211 54.301,1.338 26.488,1.432 24.202,1.465 7.438,1.592 15.693,1.592 52.142,1.592 9.851,1.973 12.391,1.973 37.918,1.973 18.995,2.1 35.378,2.227 31.314,2.481 44.141,2.481 47.316,2.481 33.341,2.63 28.523,2.742 24.71,2.862 39.188,3.243 11.375,3.497 16.328,3.497 21.535,3.497 36.5,3.504 32.076,3.751 37.664,4.259 9.47,4.386 7.819,4.513 36.14,4.767 39.188,5.148 37.41,5.529 9.216,5.91 11.417,6.029 59.309,6.096 36.521,6.545 38.646,6.716 7.692,6.926 9.978,6.926 64.334,7.053 1.469,7.688 3.628,7.815 62.429,8.196 6.041,8.45 9.978,8.45 11.629,8.831 8.708,8.958 60.397,10.863 49.221,11.117 64.08,12.895 62.429,13.022 49.602,14.038 63.572,15.054 23.313,16.705 58.365,17.467 22.424,17.594 64.334,19.245 49.983,19.753 39.315,20.388 44.107,20.376 63.445,20.388 42.019,20.502 45.404,20.66 46.922,21.04 40.458,21.277 48.586,21.404 49.602,21.658 49.602,22.801 34.768,23.081 47.081,23.191 22.424,23.69 41.728,23.817 39.108,23.887 48.599,23.982 50.745,24.071 34.798,24.574 40.204,24.579 47.397,24.71 49.856,24.833 20.773,25.087 24.329,25.468 48.664,25.513 50.604,25.752 38.807,25.976 48.061,26.545 41.323,26.577 21.408,26.738 44.676,26.735 50.213,26.798 43.094,26.83 46.859,26.83 40.071,26.982 22.297,27.754 39.188,28.262 47.062,28.516 50.618,28.516 40.627,28.791 48.726,28.823 43.221,28.886 45.594,28.886 63.445,29.151 64.715,29.532 49.991,30.025 22.043,30.167 41.512,30.152 44.012,30.31 47.207,30.373 63.318,30.548 64.588,30.675 59,30.802 61.921,31.31 57.095,31.437 60.524,31.437 64.842,31.691 24.964,31.945 22.932,32.453 23.44,33.469 60.27,33.596 64.969,33.723 25.603,33.915 61.921,33.977 21.998,34.327 56.46,34.612 59.381,34.739 64.588,34.866 58.016,35.128 62.81,35.628 22.551,35.882 24.202,36.009 58.873,36.009 64.715,36.136 56.587,36.263 55.444,36.39 59.889,37.025 49.328,37.146 61.921,37.152 51.634,37.279 54.174,37.279 21.916,37.406 61.032,37.533 51.634,37.914 24.075,38.041 54.174,38.041 56.587,38.041 37.918,38.168 60.27,38.295 61.794,38.422 51.634,38.549 26.137,38.599 49.671,38.602 47.443,38.803 54.174,38.803 55.317,38.93 51.634,39.184 62.048,39.311 60.651,39.438 59.69,39.497 54.174,39.565 24.202,39.692 22.297,39.819 34.108,39.819 51.634,39.819 58.365,39.946 61.413,40.073 62.556,40.073 63.826,40.073 48.001,40.187 54.174,40.327 56.206,40.327 59.69,40.386 49.907,40.444 51.634,40.454 64.842,40.581 58.492,40.708 60.524,40.835 62.048,40.962 51.634,41.089 54.174,41.089 55.317,41.216 48.84,41.343 47.062,41.47 51.634,41.724 54.174,41.851 56.333,41.978 49.856,42.232 51.634,42.359 60.016,42.359 60.905,42.359 61.794,42.359 48.022,42.521 54.174,42.613 17.595,42.87 46.173,42.994 51.634,42.994 61.413,42.994 25.091,43.121 60.524,43.121 62.175,43.121 64.969,43.121 54.301,43.375 59.635,43.375 51.634,43.629 54.936,43.756 55.698,43.756 57.603,43.756 56.642,43.815 59.127,43.883 49.475,44.01 51.761,44.264 64.588,44.264 45.602,44.342 63.064,44.391 47.189,44.772 52.142,44.772 43.76,45.153 50.491,45.153 52.578,45.212 63.064,45.28 51.507,45.661 64.461,45.661 52.959,45.72 49.094,45.788 45.11,45.969 63.064,46.042 53.467,46.101 57.658,46.228 59.254,46.296 54.229,46.355 54.991,46.355 55.626,46.355 56.388,46.355 57.023,46.355 47.189,46.423 50.364,46.804 59.762,46.804 64.969,46.804 60.397,47.058 61.159,47.058 61.921,47.058 56.588,47.147 45.665,47.185 53.74,47.233 41.855,47.312 48.459,47.312 51.761,47.312 55.698,47.82 46.427,47.947 48.078,48.201 42.871,48.328 49.856,48.455 52.015,48.963 6.93,49.217 54.428,49.217 60.186,49.224 56.087,49.406 18.487,49.598 47.697,49.598 52.777,49.979 12.391,50.36 50.239,50.351 56.714,50.487 10.486,50.614 58.451,50.68 46.808,50.741 14.169,50.868 48.078,51.122 19.002,51.176 7.946,51.249 56.714,51.757 14.423,52.138 12.021,52.39 57.745,52.629 9.851,53.027 54.682,53.154 56.587,53.408 51.507,53.535 48.205,53.662 14.55,54.424 17.219,54.439 49.8,54.449 51.577,54.492 53.676,54.492 8.327,54.551 26.361,54.551 55.698,54.551 20.026,54.629 23.099,54.629 11.87,54.704 58.323,54.706
IO0: J10.1 U4.18 | length 51.8
  Top Layer w0.254: J10.1 4.572,22.733 5.588,23.749 20.701,23.749 25.4,19.05 48.641,19.05 50.607,17.084 U4.18
IO1: J10.2 U4.17 | length 50.8
  Top Layer w0.254: J10.2 5.334,20.193 8.255,23.114 20.193,23.114 25.019,18.288 47.879,18.288 49.107,17.06 U4.17
IO10: J10.3 U4.10 | length 40.4
  Top Layer w0.254: J10.3 5.355,17.653 10.118,22.415 19.748,22.415 24.511,17.653 37.211,17.653 38.239,16.625 38.284,16.625 38.607,16.302 U4.10
M0: J6.01 R17.2 U2.20 U4.15 | length 110.9
  Top Layer w0.324: R17.2 20.953,52.25 22.043,53.34 24.892,53.34 26.035,52.197 26.035,49.784 26.67,49.149 v1(28.194,49.149) ; v1(35.21,30.334) 30.88,30.334 27.305,33.909 27.305,38.1 31.242,42.037 35.179,42.037 36.692,40.524 36.692,40.472 36.83,40.334 v1(36.83,40.259) ; U2.20 39.264,51.653 39.264,50.779 39.751,50.292 42.926,50.292 45.466,52.832 J6.01 ; U4.15 46.107,14.576 46.533,14.15 46.937,14.15 v1(46.99,14.097)
  Bottom Layer w0.324: v1(28.194,49.149) 28.829,49.149 30.099,47.879 30.099,39.878 31.369,38.608 35.179,38.608 v1(36.83,40.259) 45.466,48.895 J6.01 ; v1(35.21,30.334) 35.814,29.731 35.814,18.034 39.751,14.097 v1(46.99,14.097)
M1: J6.02 R18.2 U2.21 U4.16 | length 86.1
  Top Layer w0.324: R18.2 24.204,52.25 25.146,51.308 25.146,49.149 25.908,48.387 v1(31.242,48.387) ; v1(32.512,40.894) 32.488,40.87 31.726,40.87 29.668,38.812 29.668,34.213 31.877,32.004 v1(35.687,32.004) ; U2.21 37.895,52.072 38.655,52.832 41.148,52.832 J6.02 ; v1(47.244,17.399) 47.244,17.324 47.52,17.048 47.52,16.089 U4.16
  Bottom Layer w0.324: v1(31.242,48.387) 31.242,47.625 31.75,47.117 31.75,41.603 v1@32.459,40.894 ; v1(32.512,40.894) v1@32.459,40.894 ; v1(35.687,32.004) 36.957,30.734 36.957,18.923 38.1,17.78 46.863,17.78 v1(47.244,17.399) ; J6.02 42.338,54.022 42.338,49.704 33.528,40.894 v1@32.459,40.894
NetD2_A: D2.A P2.1
NetJ1_A5: J1.A5 R1.2 | length 3.5
  Top Layer w0.381: R1.2 42.926,9.017 43.83,8.113 43.83,7.295 J1.A5
NetJ1_B5: J1.B5 R2.2 | length 3.3
  Top Layer w0.381: J1.B5 46.835,8.608 47.371,9.144 R2.2
NetJ7_02: J7.02 R10.2 | length 10.1
  Top Layer w0.324: R10.2 23.575,6.02 23.575,6.008 24.003,5.58 24.003,4.445 24.511,3.937 v1(25.4,3.937)
  Bottom Layer w0.324: v1(25.4,3.937) 29.337,3.937 J7.02
NetQ1_3: Q1.3 R8.2 U5.2 U5.3 | length 15.5
  Top Layer w0.381: U5.3 U5.2 29.064,10.395 28.702,10.033 28.702,8.255 29.337,7.62 33.909,7.62 34.487,8.198 Q1.3 34.312,9.652 34.177,9.787 34.177,9.991 34.159,10.01 R8.2@34.159,11.926
RESET: C10.2 R5.2 RESET.1 U4.2 | length 31.1
  Top Layer w0.381: C10.2 27.649,23.532 29.083,22.098 RESET.1 32.599,22.098 32.389,22.308 32.389,24.896 32.436,24.943 33.96,24.943 40.513,31.496 48.387,31.496 49.107,32.216 U4.2
SCL: J5.1 R4.1 U4.6 U6.10 | length 56.6
  Top Layer w0.381: J5.1 6.858,40.259 7.747,41.148 7.747,47.244 9.398,48.895 14.478,48.895 16.637,46.736 U6.10@17.018,46.736 ; 18.796,46.736 19.431,47.371 19.431,47.879 19.963,48.411 21.539,48.411 22.325,47.625 34.29,47.625 43.107,38.808 U4.6
SDA: J5.2 R3.1 U4.7 U6.9 | length 55.3
  Top Layer w0.381: J5.2 6.858,37.719 8.89,39.751 8.89,46.863 10.033,48.006 14.224,48.006 16.066,46.164 16.774,46.164 ; 18.828,46.201 19.145,46.201 19.847,46.903 19.847,46.905 20.684,47.742 R3.1 20.934,47.742 21.069,47.607 21.069,46.876 21.463,46.482 33.147,46.482 41.607,38.022 U4.7
UART1_RX: U4.11 U5.1 | length 14.6
  Top Layer w0.381: U5.1 32.366,9.125 32.766,9.525 32.766,12.446 34.163,13.843 39.116,13.843 40.107,14.834 U4.11
UART1_TX: Q1.1 U4.12 | length 9.9
  Top Layer w0.381: Q1.1 38.039,8.702 39.116,9.779 39.116,12.319 41.607,14.81 U4.12
UART2_RX: J6.04 U2.23 U4.5 | length 26.2
  Top Layer w0.324: J6.04 37.267,54.031 36.886,54.031 35.517,52.662 35.517,51.914 U2.23 35.355,49.862 44.607,40.61 U4.5
UART2_TX: J6.03 U2.22 U4.4 | length 27.4
  Top Layer w0.324: J6.03 39.842,54.066 39.39,54.066 38.768,53.444 37.823,53.444 36.848,52.469 36.848,51.975 U2.22 36.625,50.556 46.107,41.074 U4.4
USB_N: J1.A7 J1.B7 U1.1 | length 7.6
  Top Layer w0.16: J1.B7 44.297,7.252 44.297,5.777 44.486,5.588 45.184,5.588 45.365,5.769 45.365,7.26 J1.A7
  Top Layer w0.324: U1.1 44.135,9.738 44.474,9.399 44.474,9.355 44.846,8.983 44.846,8.365 44.657,8.176 44.554,8.176 44.369,7.991 J1.B7@44.369,7.239
USB_P: J1.A6 J1.B6 U1.3 | length 6.3
  Top Layer w0.16: v1(44.831,6.35) 44.833,6.352 44.833,7.288 J1.A6 ; J1.B6 45.867,7.258 45.867,6.382 v1(45.899,6.35)
  Top Layer w0.324: J1.B6@45.801,7.239 45.801,7.991 45.616,8.176 45.513,8.176 45.324,8.365 45.324,8.983 45.696,9.355 45.696,9.399 46.035,9.738 U1.3
  Bottom Layer w0.16: v1(44.831,6.35) v1(45.899,6.35)
VBUS: D1.A J1.A4_B9 J1.B4_A9 | length 15.5
  Top Layer w0.4: J1.A4_B9 42.785,7.19 42.785,6.59 42.874,6.501 42.874,6.31 43.074,6.11 ; 47.385,5.475 47.385,5.85 47.296,5.939 47.296,6.501 47.385,6.59 47.385,7.19 J1.B4_A9
  Top Layer w0.8: 43.074,6.11 43.074,5.313 43.815,4.572 46.482,4.572 ; 47.385,5.475 46.482,4.572 ; D1.A 50.593,3.777 49.798,4.572 46.482,4.572
pads on no net: J1. J1.A8 J1.B8 J3.1 J7.03 P2.P1 P2.P2 U2.1 U2.3 U2.4 U2.5 U2.6 U2.7 U6.2

## Polygon pours and split planes (outlines as drawn)
GND on Bottom Layer "GND_L02_P001" (solid, remove dead copper, pour order 1): 0,56.134 65.786,56.134 65.786,0 0,0
GND on Top Layer "GND_L01_P000" (solid, remove dead copper, pour order 0): 0,56.134 65.786,56.134 65.786,0 0,0 0,3.81

## Keep-outs
Keep-Out Layer:
  the board outline again, w0.254

## Other copper
Top Layer:
  pour cut-out: 52.07,35.306 52.07,44.069 53.848,45.847 59.69,45.847 59.69,46.228 60.071,46.609 62.23,46.609 62.611,46.228 62.611,43.815 62.23,43.434 60.071,43.434 59.69,43.815 59.69,44.196 54.483,44.196 53.721,43.434 53.721,35.306
  region net 3V3: 31.623,26.543 29.337,26.543 29.337,24.384 31.623,24.384
  region net 3V3: 20.32,51.181 23.114,51.181 24.13,51.181 24.13,49.403 24.13,48.895 20.32,48.895
  region net 5V: 26.924,51.562 28.956,51.562 28.956,50.927 29.21,50.673 32.131,50.673 32.385,50.927 32.385,52.451 33.274,52.451 33.274,50.292 32.893,49.911 27.559,49.911 26.924,50.546
  region net 5V: 51.308,6.35 57.277,6.35 57.277,5.461 51.308,5.461 51.308,6.223
  region net 5V: 55.372,2.667 55.372,6.096 57.277,6.096 57.277,2.667
  region net 5V: 51.308,22.86 51.308,19.304 52.197,18.415 53.467,18.415 53.467,19.177 52.959,19.685 52.959,22.86
  region net 5V: 53.467,5.715 51.308,5.715 51.308,13.716 52.197,14.605 52.197,18.415 51.435,19.177 53.467,19.177
  region net NetD2_A: 59.309,13.589 55.372,13.589 55.372,6.731 58.166,6.731 58.166,10.795 59.309,11.938
  region net 5V: 51.308,22.86 60.198,22.86 60.198,19.177 57.404,19.177 57.404,21.336 57.277,21.463 51.308,21.463
  region net 3V3: 55.88,32.893 52.578,32.893 52.07,32.385 52.07,24.892 51.943,24.765 52.959,23.749 54.61,23.749 54.61,26.289 53.213,27.686 53.213,30.099 54.229,31.115 55.88,31.115
  region net 3V3: 57.277,28.194 57.785,27.686 57.785,25.654 55.499,25.654 54.864,26.289 54.864,28.067 53.213,28.067 53.213,24.003 53.467,23.749 61.468,23.749 62.357,22.86 64.135,22.86 64.135,27.051 63.5,27.686 60.452,27.686 60.452,29.972 57.277,29.972
  region net 3V3: 50.038,34.544 50.038,31.369 55.88,31.369 55.88,32.893 51.689,32.893 51.308,33.274 51.308,34.544
  region net GND: 22.098,9.144 24.003,9.144 24.003,7.366 22.098,7.366
  region net 5V: 21.844,12.573 21.844,14.732 24.13,14.732 24.13,12.573 22.733,12.573
  region net 5V: 24.765,6.096 25.654,6.096 25.654,7.874 26.543,8.763 26.924,8.763 26.924,9.525 24.765,9.525
  region net 5V: 40.132,11.684 40.132,9.906 43.18,9.906 43.18,11.684
  region net 5V: 44.831,13.081 44.831,11.684 42.926,11.684 42.037,11.684 42.037,11.049 45.339,11.049 45.339,13.081
  region net AIN2: 18.542,44.831 16.891,44.831 16.891,44.323 18.542,44.323
  region net GND: 12.446,46.85 11.557,46.85 11.557,45.593 12.446,45.593 12.446,45.847
  region net 5V: 17.145,45.847 25.527,45.847 25.527,44.196 19.939,44.196 18.542,45.593 17.145,45.593
  region net SDA: 16.51,46.355 18.923,46.355 18.923,46.101 16.51,46.101
  region net SCL: 16.51,46.863 18.923,46.863 18.923,46.609 16.51,46.609
  region net GND: 12.152,46.85 14.565,46.85 14.565,46.596 12.152,46.596
  region net GND: 12.192,45.847 14.605,45.847 14.605,45.593 12.192,45.593
  region net A12: 12.192,45.339 14.605,45.339 14.605,45.085 12.192,45.085
  text "VIETTIEN" at 36.576,25.78 h0.8 r270
Bottom Layer:
  region net 5V: 24.892,6.096 24.765,6.223 24.765,10.922 24.257,11.43 22.987,11.43 22.987,12.319 24.638,12.319 25.654,11.303 25.654,6.223 25.527,6.096
  pour cut-out: 52.07,35.433 52.07,44.196 53.848,45.974 59.69,45.974 59.69,46.355 60.071,46.736 62.23,46.736 62.611,46.355 62.611,43.942 62.23,43.561 60.071,43.561 59.69,43.942 59.69,44.323 54.483,44.323 53.721,43.561 53.721,35.433
  region net 3V3: 30.861,35.179 29.464,35.179 26.924,32.639 26.924,25.527 28.067,24.384 30.353,24.384 30.861,24.892 30.861,26.162 30.48,26.543 28.956,26.543 28.194,27.305 28.194,31.877 29.718,33.401 30.861,33.401
  region net 3V3: 55.245,31.496 55.245,28.702 56.388,27.559 60.579,27.559 61.087,27.051 61.087,25.146 60.579,24.638 53.086,24.638 51.816,25.908 51.816,31.496
  region net 5V: 31.75,53.213 29.718,51.181 29.718,49.911 29.972,49.657 31.496,49.657 31.75,49.911 31.75,51.054 33.528,52.832 33.528,53.213
  region net 5V: 32.004,53.467 31.75,53.213 17.272,53.213 16.129,52.07 16.129,47.498 17.526,46.101 19.177,46.101 17.272,48.006 17.272,51.562 17.907,52.197 32.893,52.197 33.528,52.832 33.528,55.372 32.004,55.372
  region net 3V3: 23.114,51.181 23.114,48.895 23.368,48.641 25.019,48.641 26.924,46.736 26.924,35.052 28.637,33.339 49.582,33.222 51.816,30.988 55.245,30.988 55.245,32.258 52.324,35.179 29.464,35.179 28.575,36.068 28.575,47.625 25.4,50.8 25.4,51.181 25.146,51.435 23.368,51.435
  region net 5V: 51.308,10.16 51.054,10.414 51.054,11.43 50.292,12.192 42.291,12.192 41.783,11.684 41.783,10.414 40.64,10.414 40.64,12.573 41.275,13.208 52.832,13.208 53.594,12.446 53.594,10.414 53.34,10.16 51.689,10.16
  region net 5V: 34.544,13.335 34.544,10.795 35.56,9.779 41.148,9.779 41.783,10.414 41.783,11.557 40.64,11.557 40.64,11.303 40.132,10.795 36.576,10.795 36.068,11.303 36.068,13.335
  region net 5V: 21.59,13.97 21.59,15.367 21.971,15.748 35.433,15.748 36.068,15.113 36.068,12.573 34.544,12.573 34.544,14.097 34.163,14.478 23.876,14.478 23.622,14.224 23.622,13.97
  region net 5V: 14.224,11.811 13.716,12.319 13.716,47.117 11.557,47.117 11.557,45.212 11.811,44.958 11.811,10.287 12.446,9.652 23.114,9.652 23.622,10.16 23.622,14.605 21.59,14.605 21.59,12.065 21.336,11.811
  region net 5V: 2.159,47.117 25.273,47.117 25.527,46.863 25.527,43.942 23.368,43.942 23.368,44.831 22.987,45.212 2.159,45.212 2.159,46.736

## Silkscreen, mask and mechanical layers (free items; w line width, h text height)
Top Overlay:
  lines w0.154: 52.324,16.637 56.769,16.637 56.769,18.923 52.324,18.923 52.324,16.637
  lines w0.254: 6.945,10.245 10.12,10.245 ; 6.945,15.96 10.12,15.96 ; 6.945,24.342 10.12,24.342 ; 6.945,36.026 10.12,36.026 ; 6.945,41.868 10.12,41.868 ; 10.795,47.879 11.049,47.879 11.049,42.164 ; 53.467,16.383 53.467,12.065 53.467,10.16 53.975,9.652 56.388,9.652
  text "OUT" at 7.115,47.752 h1.52
  text "5V" at 7.198,45.737 h1.52
  text "GND" at 7.198,42.95 h1.52
  text "I2C" at 10.541,41.783 h1.52 r270
  text "SCL" at 7.198,40.03 h1.52
  text "SDA" at 7.198,37.49 h1.52
  text "ADC" at 10.537,35.814 h1.52 r270
  text "A12" at 7.198,34.171 h1.52
  text "A11" at 7.198,31.504 h1.52
  text "A14" at 7.198,28.075 h1.52
  text "A13" at 7.198,25.425 h1.52
  text "GPIO" at 10.537,24.003 h1.52 r270
  text "IO0" at 7.198,22.631 h1.52
  text "IO1" at 7.198,20.091 h1.52
  text "IO10" at 7.198,17.424 h1.52
  text "5V_IN" at 52.829,17.411 h1.5
  text "RS485" at 10.537,15.621 h1.52 r270
  text "-" at 55.118,14.224 h1.52
  text "A+" at 7.198,13.978 h1.52
  text "+" at 54.991,12.319 h1.52
  text "B-" at 7.198,11.311 h1.52
  text "ON" at 26.797,3.192 h1.52
  text "120R" at 29.591,3.192 h1.52
  text "OFF" at 33.528,3.192 h1.52
Bottom Overlay:
  text "GND" at 30.717,53.639 h1.52 r90
  text "5V" at 33.257,53.639 h1.52 r90
  text "AUX" at 35.797,53.639 h1.52 r90
  text "RX" at 38.279,53.639 h1.52 r90
  text "TX" at 40.946,53.639 h1.52 r90
  text "M1" at 43.486,53.639 h1.52 r90
  text "M1" at 46.026,53.639 h1.52 r90